# Altium PCB PCB.PcbDoc
Units mil, origin at the board's own origin, x right, y up, seen from the top; angles counter-clockwise.
Board outline 4265 x 3115 mil, 4 copper layers (Top Layer, Ground, Power, Bottom Layer), stack 61.811 mil thick; 45 components, 35 nets, 179 pads, 83 vias.
Unrouted connection lines stored in the file: 1.
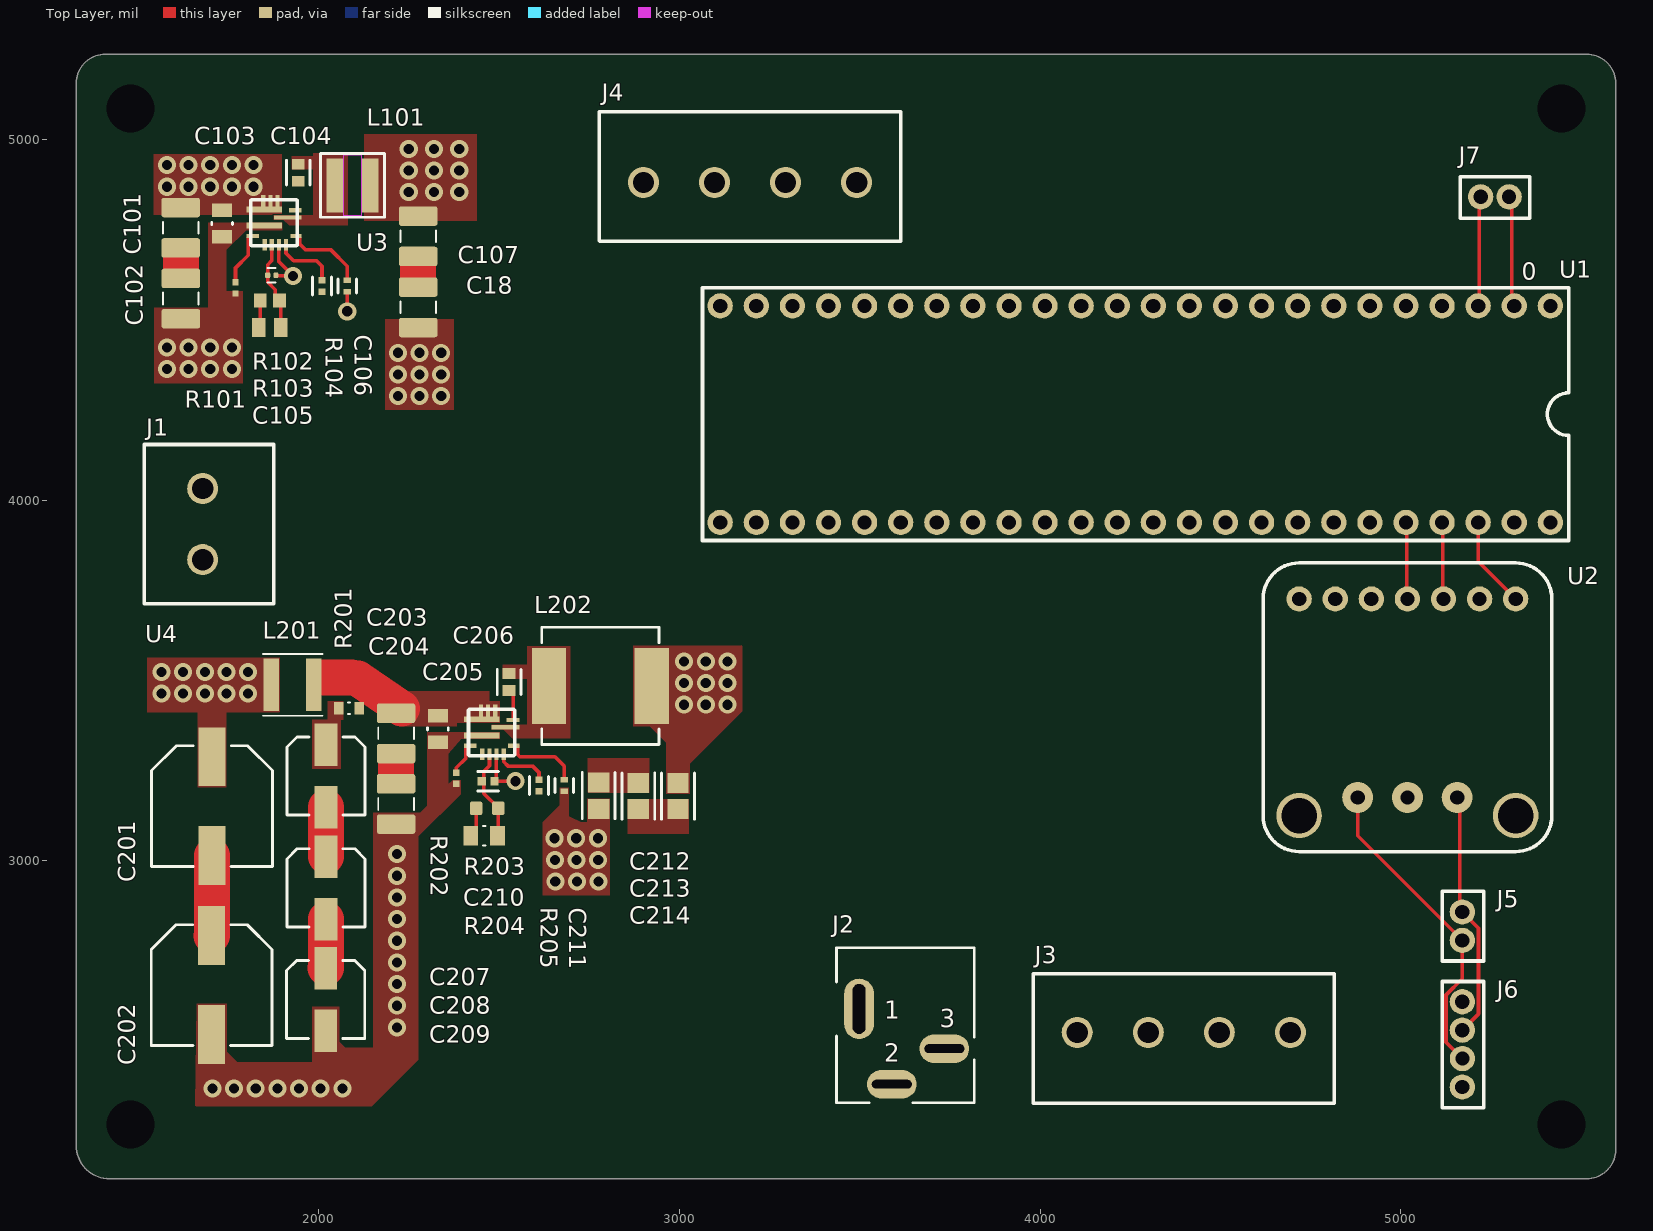
[diagram p0: Top Layer view]
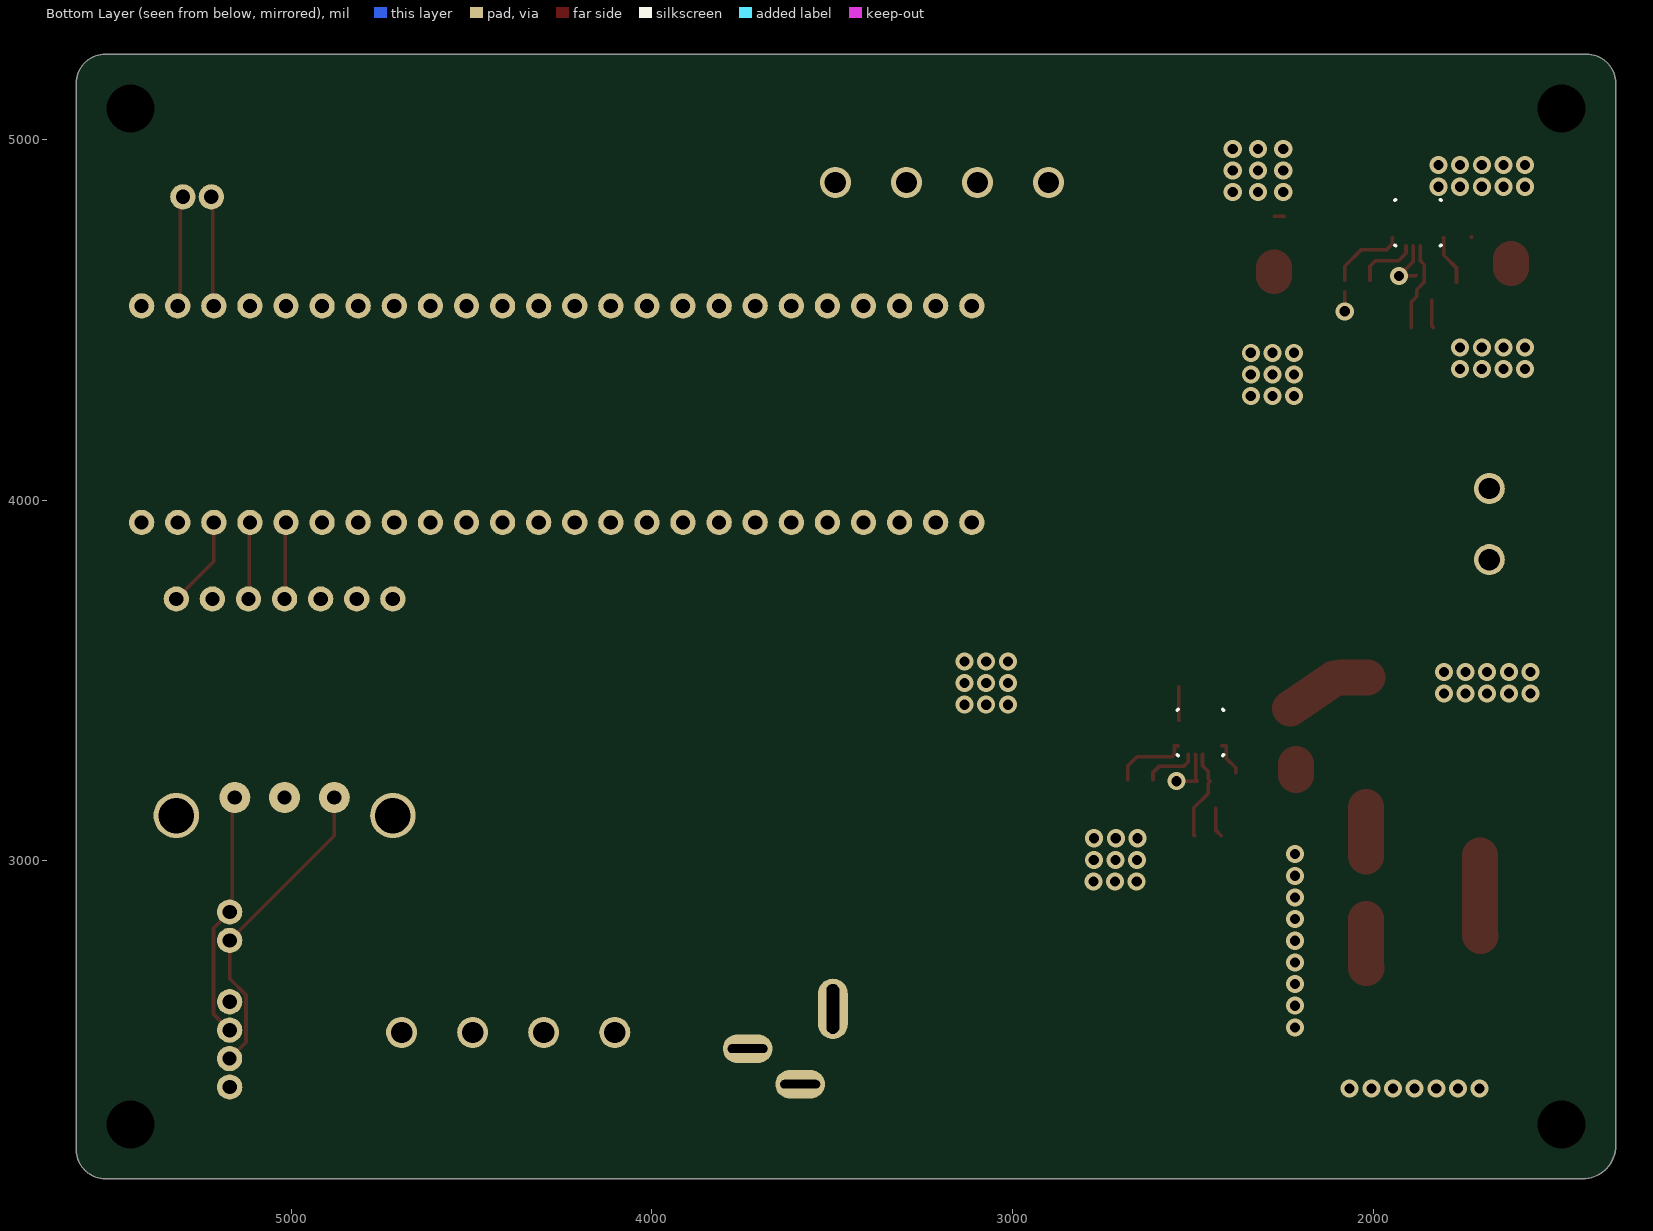
[diagram p1: Bottom Layer view, seen from below]
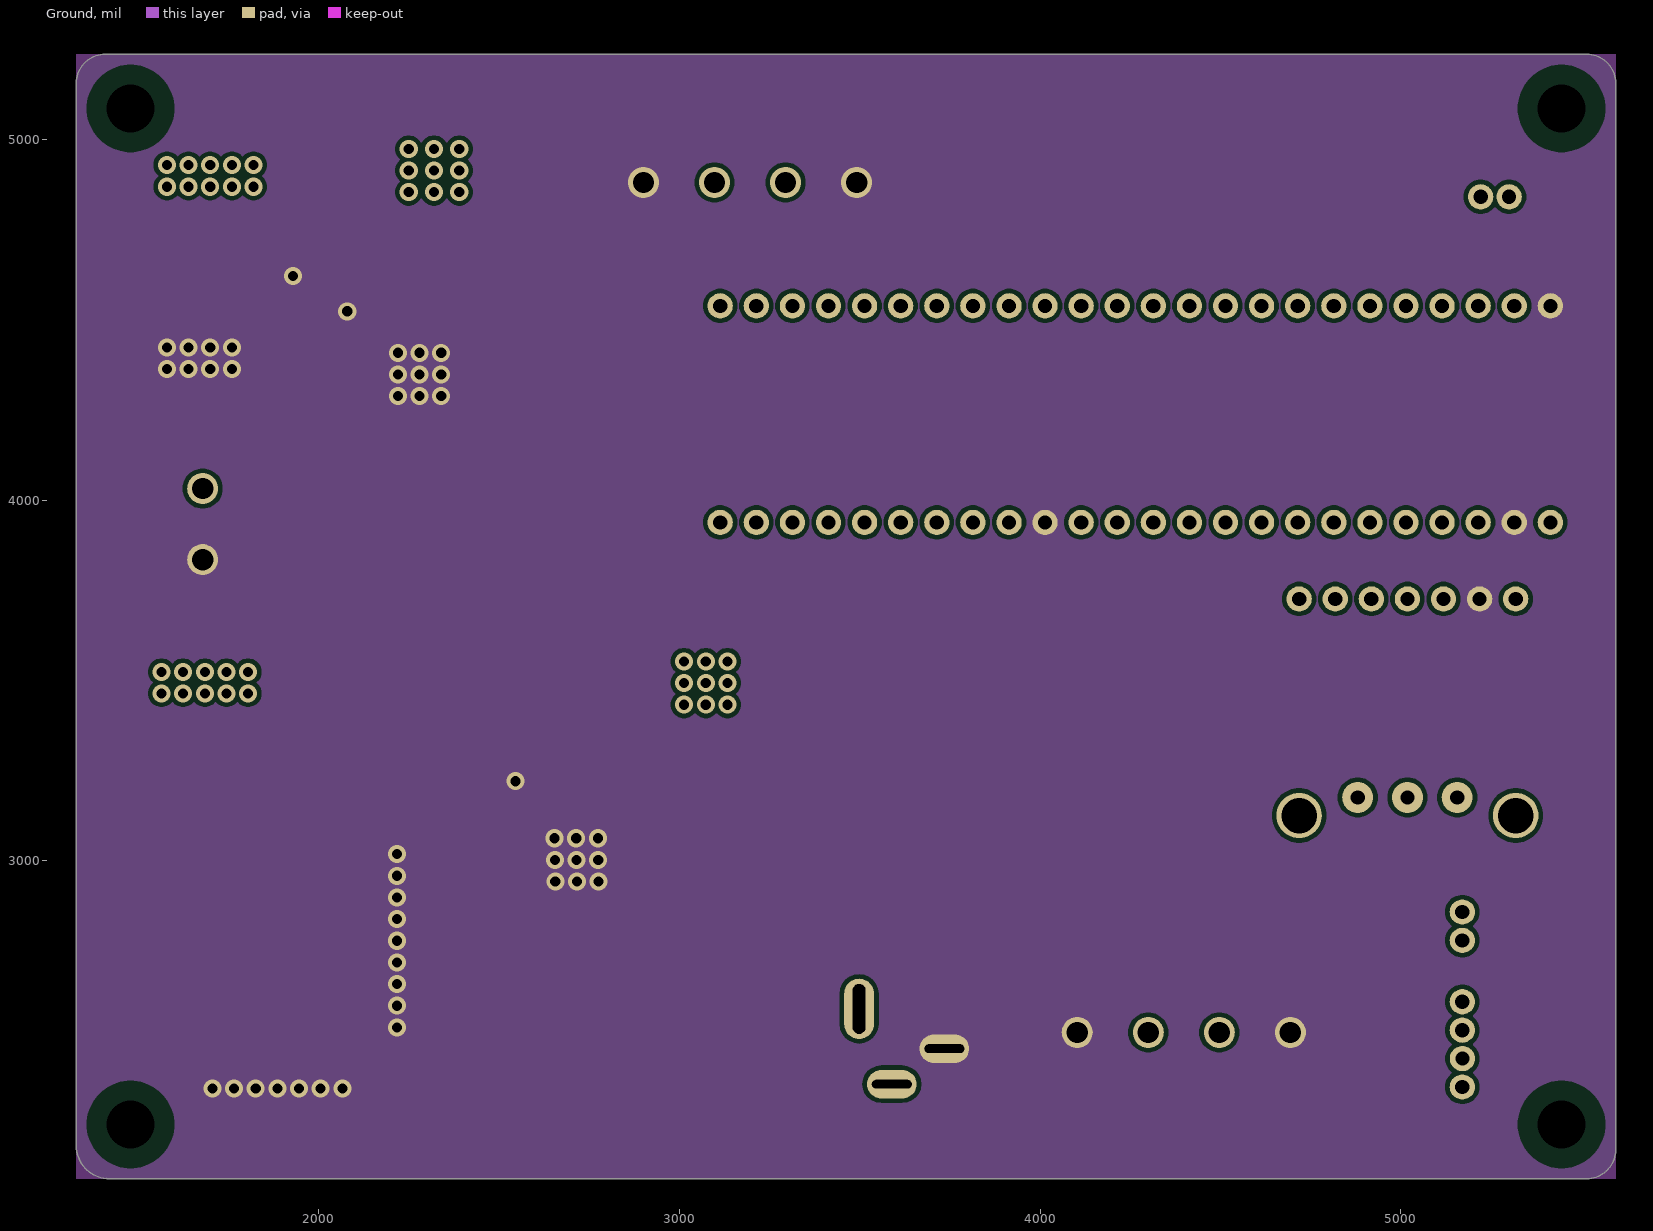
[diagram p2: Ground]
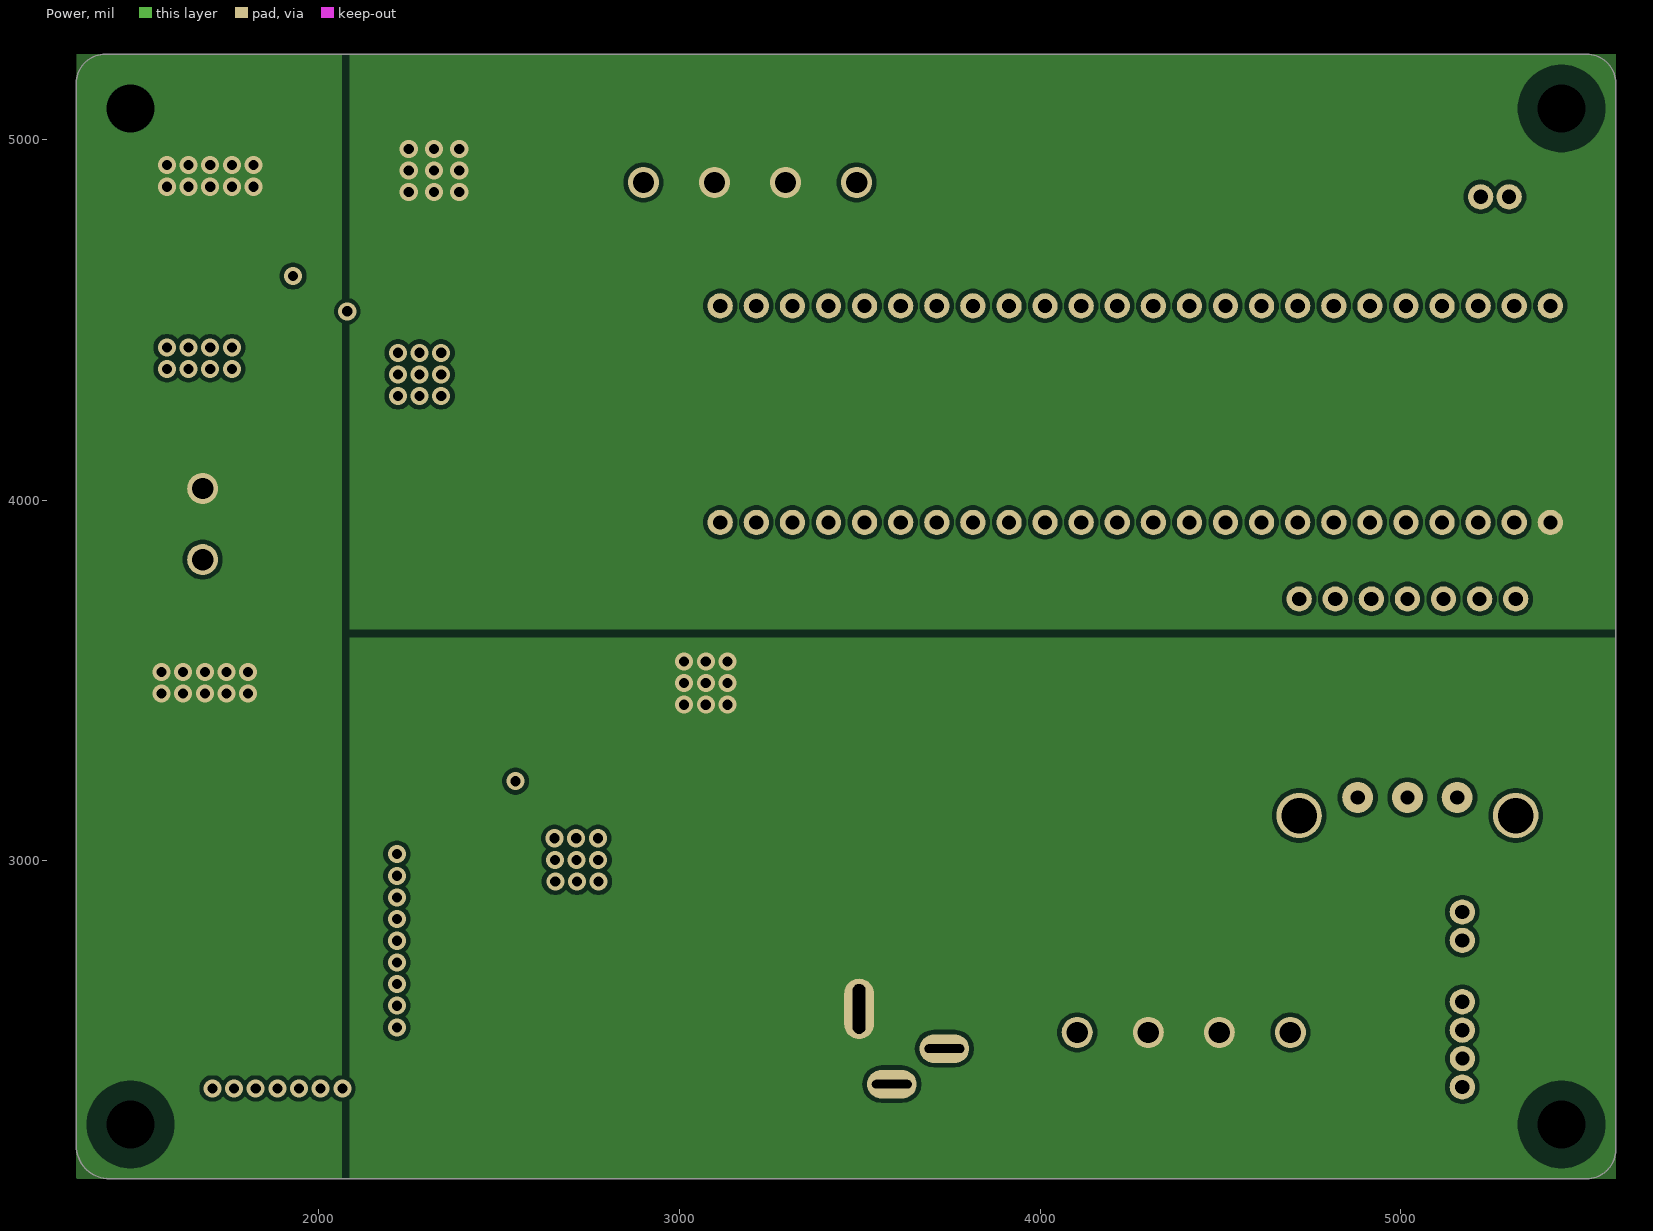
[diagram p3: Power]
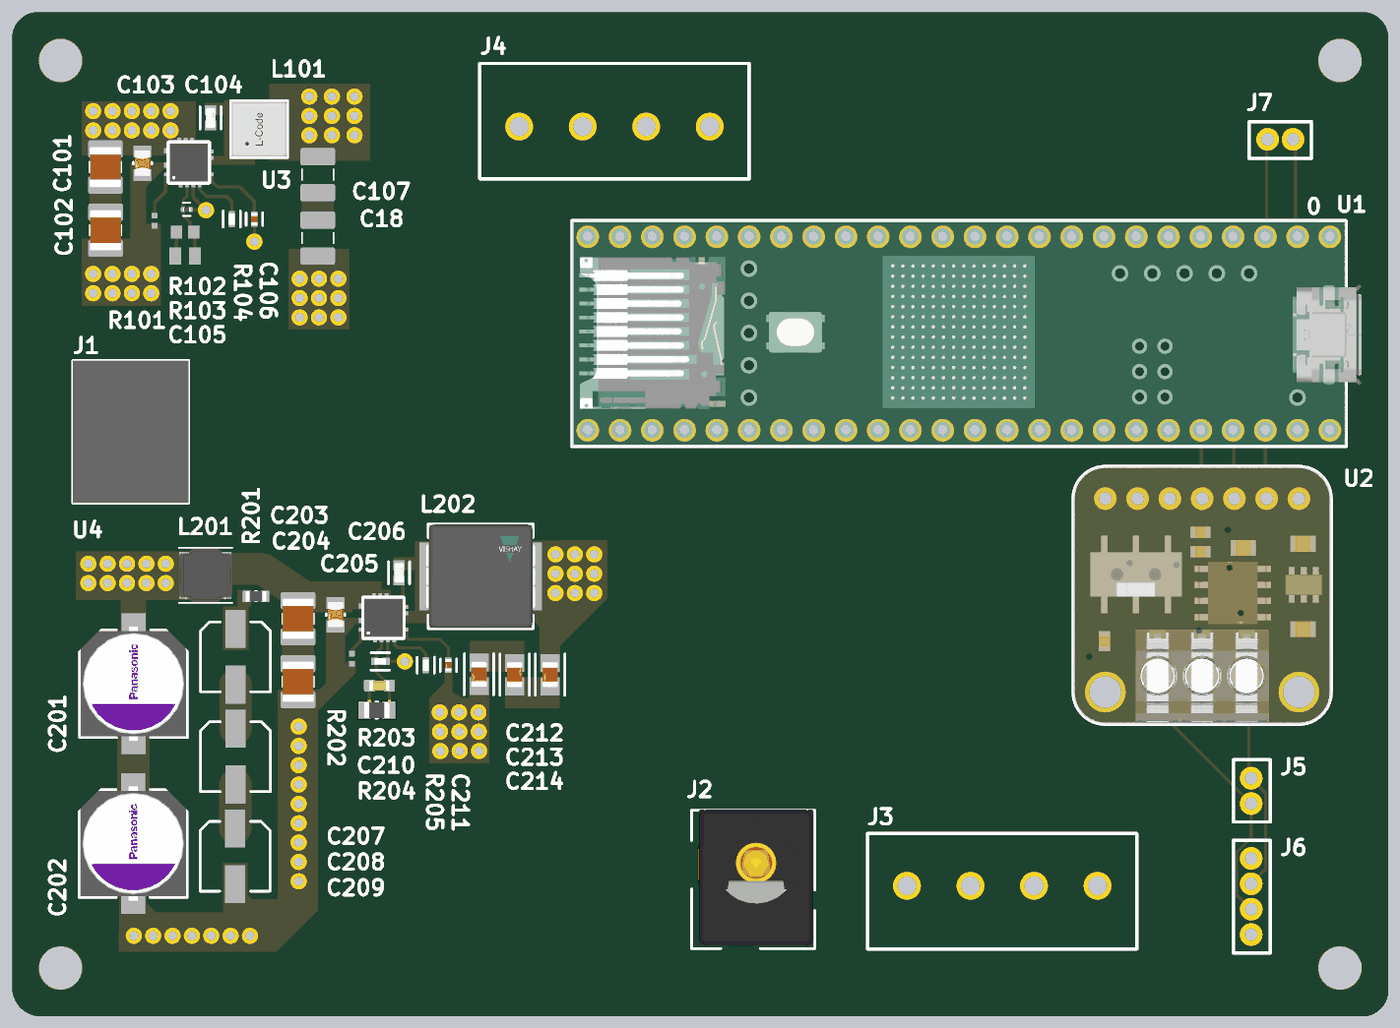
[diagram p4: 3D render of the assembled board from above, using the file's embedded part models]

## Layer stack, top to bottom
Top Solder: solder mask 0.4, Solder Resist, Dk 3.5
Top Layer: signal copper 1.378
Dielectric 2: prepreg 7.874, PP-006, Dk 4.7
Ground: signal copper 1.378
Dielectric 1: core 40.5512, Core-025, Dk 4.6
Power: signal copper 1.378
Dielectric 3: prepreg 7.874, PP-006, Dk 4.7
Bottom Layer: signal copper 1.378
Bottom Solder: solder mask 0.4, Solder Resist, Dk 3.5

## Board outline
1330,2210 1330,5155 cw(c1410,5155) 1410,5235 1405,5235 5515,5235 cw(c5515,5155) 5595,5155 5595,2200 cw(c5515,2200) 5515,2120 1415,2120 1420,2120 cw(c1420,2210)

## Design rules (kind name [scope] priority, off if disabled: settings)
Clearance "clearance poly to non vcc" [INPolygon vs ISThruPin OR IsVia] p1: gap=12 ignorepadtopadclearanceinfootprint=FALSE
Clearance "NET ini112v2" [InNet('NetC_IN1_12V_2') vs InNet('NetC_IN1_12V_2')] p2: gap=0 ignorepadtopadclearanceinfootprint=FALSE
Clearance [All] p3: gap=5 ignorepadtopadclearanceinfootprint=FALSE
PlaneClearance [InNet('NetC_IN1_12V_2')] p1: clearance=787.4
PlaneConnect "GND net" [InNet('GND')] p1: planeconnectstyle=Direct reliefexpansion=20 reliefentries=4 reliefconductorwidth=10 reliefairgap=10
PlaneConnect "12V net" [InNet('+12V')] p2: planeconnectstyle=Direct reliefexpansion=20 reliefentries=4 reliefconductorwidth=10 reliefairgap=10
PlaneConnect "5V net" [InNet('+5V')] p3: planeconnectstyle=Direct reliefexpansion=20 reliefentries=4 reliefconductorwidth=10 reliefairgap=10
PlaneConnect "VCC net" [InNet('VCC')] p4: planeconnectstyle=Direct reliefexpansion=20 reliefentries=4 reliefconductorwidth=10 reliefairgap=10
PlaneConnect [All] p5: planeconnectstyle=Relief reliefexpansion=20 reliefentries=4 reliefconductorwidth=10 reliefairgap=10
PolygonConnect "boot 12V2 poly" [InNet('NetC_BOOT_12V_2') vs InNet('NetC_BOOT_12V_2')] p1: connectstyle=Direct reliefconductorwidth=10 reliefentries=4 polygonreliefangle="90 Angle" airgapwidth=10
PolygonConnect "boot 5V2 poly" [InNet('NetC_BOOT_5V_2') vs InNet('NetC_BOOT_5V_2')] p2: connectstyle=Direct reliefconductorwidth=10 reliefentries=4 polygonreliefangle="90 Angle" airgapwidth=10
PolygonConnect "VCC poly" [InNet('VCC') vs InNet('VCC')] p3: connectstyle=Direct reliefconductorwidth=10 reliefentries=4 polygonreliefangle="90 Angle" airgapwidth=10
PolygonConnect "5V poly" [InNet('+5V') vs InNet('+5V')] p4: connectstyle=Direct reliefconductorwidth=10 reliefentries=4 polygonreliefangle="90 Angle" airgapwidth=10
PolygonConnect "12V poly" [InNet('+12V') vs InNet('+12V')] p5: connectstyle=Direct reliefconductorwidth=10 reliefentries=4 polygonreliefangle="90 Angle" airgapwidth=10
PolygonConnect "GND poly" [InNet('GND') vs InNet('GND')] p6: connectstyle=Direct reliefconductorwidth=10 reliefentries=4 polygonreliefangle="90 Angle" airgapwidth=10
PolygonConnect [All] p7: connectstyle=Direct reliefconductorwidth=10 reliefentries=4 polygonreliefangle="90 Angle" airgapwidth=10
RoutingVias [All] p1: holewidth=28 width=50 viastyle="Through Hole" minholewidth=28 minwidth=50 maxholewidth=28 maxwidth=50
SolderMaskExpansion [All] p1: expansion=0 istentingtop=FALSE
SupplyNets "Schematic Supply Nets_3" [InNet('+5V')] p1: voltage=0.000
SupplyNets "Schematic Supply Nets_2" [InNet('GND')] p2: voltage=0.000
SupplyNets "Schematic Supply Nets_1" [InNet('+12V')] p3: voltage=0.000
SupplyNets "Schematic Supply Nets" [InNet('VCC')] p4: voltage=0.000
Width [All] p1: maxlimit=100 minlimit=3 preferedwidth=10
28 further rules are at their usual default settings.

## Components (designator, comment, footprint, x,y, rotation, side; value= is the part's Value field where it differs from the comment)
C18 "MSAST32MSB7226KPNB25" CAPC3225X270N 2277.14,4533.94 r90 top
C101 "MSASU32MSB5106KPNA01" CAPC3225X270N 1619.1,4754.42 r90 top
C102 "MSASU32MSB5106KPNA01" CAPC3225X270N 1619.66,4558.35 r90 top
C103 "CC0805KRX7R9BB104" FP-CC0805-0_85-MFG 1733.83,4766.23 r270 top value="100 nF"
C104 "C0603C104Z4VACTU" FP-C0603C104Z4VACTU-MFG 1945,4907 r90 top
C105 "C0603C151K3GACTU" CAPC1608X87X35NL15T15 1866,4553 r180 top
C106 "GRM155R71C223KA01D" FP-GRM155-0_05-MFG 2080.73,4593 r270 top
C107 "MSAST32MSB7226KPNB25" CAPC3225X270N 2277.14,4730.8 r90 top
C201 "35SVPF39M" FP-OS-CON-SMT-E7-MFG 1706,3152 r90 top
C202 "35SVPF39M" FP-OS-CON-SMT-E7-MFG 1705,2656.19 r90 top
C203 "MSASU32MSB5106KPNA01" CAPC3225X270N 2216,3353.44 r90 top
C204 "MSASU32MSB5106KPNA01" CAPC3225X270N 2216,3158 r90 top
C205 "CC0805KRX7R9BB104" FP-CC0805-0_85-MFG 2332,3366 r270 top value="100 nF"
C206 "C0603C104Z4VACTU" FP-C0603C104Z4VACTU-MFG 2529,3496 r90 top
C207 "UUD1V100MCL1GS" NIC-CAPA2-5X5.8_V 2022,3235.39 r270 top
C208 "UUD1V100MCL1GS" NIC-CAPA2-5X5.8_V 2022,2925.61 r270 top
C209 "UUD1V100MCL1GS" NIC-CAPA2-5X5.8_V 2021,2616.39 r270 top
C210 "CL10C330JB8NNNC" CL10C330JB8NNNC 2533.29,3211 r180 top
C211 "GRM155R71C223KA01D" FP-GRM155-0_05-MFG 2682,3209.25 r270 top
C212 "GRM21BR61E106MA73L" FP-GRM21B-0_15-IPC_A 2997,3180 r270 top
C213 "GRM21BR61E106MA73L" FP-GRM21B-0_15-IPC_A 2887.24,3180 r90 top
C214 "GRM21BR61E106MA73L" FP-GRM21B-0_15-IPC_A 2777,3181 r270 top
J1 "TAH05-02-1-L-G" TAH05-02-1-L-G 1680,4031.85 r270 top
J2 "694108402002" 694108402002 3434.72,2331.06 r0 top
J3 "TAH05-04-1-L-G" TAH05-04-1-L-G 4815.75,2686.42 r180 top
J4 "TAH05-04-1-L-G" TAH05-04-1-L-G 2779.25,4718.58 r0 top
J5 "JST SM 2-PIN" "JST SM 2-PIN" 5114.88,2915.83 r270 top
J6 "JST XH 4-PIN" "JST XH 4-PIN" 5112.91,2668.07 r270 top
J7 "JST SM 2-PIN" "JST SM 2-PIN" 5356.84,4895.37 r180 top
L101 "74439324033" WE-XHMI_4030 2095,4872 r90 top
L201 "PA4332.222NLT" PA4332.222NLT 1834.06,3398 r0 top
L202 "IHLP3232DZER5R6M01" FP-IHLP-3232DZ-FP_2_413x5-MFG 2782,3485 r0 top
R101 "CRCW040252K3FKED" RESC1005X40X25LL05T05 1771,4588 r90 top
R102 "RC0201FR-0710KL" RESC0603X26N 1871,4623 r180 top
R103 "ERJ-6ENF7322V" RESC2013X70X40LL20T20 1866,4478 r180 top
R104 "CRCW0402100KFKED" FP-CRCW0402-e3-IPC_C 2010.68,4593 r270 top
R201 "ERJ-3RSFR10V" ERJ-3RSFR10V 2020.54,3363 r0 top
R202 "CRCW040252K3FKED" RESC1005X40X25LL05T05 2383,3229.25 r90 top
R203 "CRCW040220K0FKED" FP-CRCW0402-e3-IPC_B 2471,3221 r180 top
R204 "ERJ-6ENF3833V" RESC2012X70N 2459.99,3070 r180 top
R205 "CRCW0402100KFKED" FP-CRCW0402-e3-IPC_C 2611.95,3209.25 r270 top
U1 "teensy 4.1" "Teensy 4.1" 3064.79,4588 r270 top
U2 "Adafruit CAN PAL" "ADAFRUIT CAN PAL" 5418,3826 r180 top
U3 "Comment" TPS56A37RPAR 1814.62,4832.41 r270 top
U4 "TPS56A37RPAR" TPS56A37RPAR 2417.57,3420.05 r270 top

## Footprints (in the part's own frame and the unit in brackets; to place one, negate y for a bottom-side part, rotate by r counter-clockwise, add the part's x,y. Pads: shape width x height; smd on the part's side, far side on the other; paste and mask are expansions set on the pad)
694108402002 [mm]
  oval 2.1x4.25 hole 0.9 slot 3.5 at 90 deg mask+0.102: 1(1.627,6.583)
  oval 3.5x2 hole 0.6 slot 2.8 at 0 deg mask+0.102: 2(3.927,1.283) 3(7.627,3.783)
  silkscreen extent 0.03,-0.02 9.73,10.88, body extent 0.6,0.23 9.6,10.92, height 14
"ADAFRUIT CAN PAL" [mil]
  round 86 hole 39.37: 1(262.2,650) 2(400,650) 3(537.8,650)
  round 70 hole 39.37: 4(100,100) 5(200,100) 6(300,100) 7(400,100) 8(500,100) 9(600,100) 10(700,100)
  round 125.98 hole 98.43: P1(100,700) P2(700,700)
  silkscreen extent 0,0 800,800, body extent 0,0 800,800, height 396
CAPC1608X87X35NL15T15 [mm] "Chip Capacitor, 2-Leads, Body 1.60x0.80mm, IPC Medium Density"
  rect 0.9x1 smd: 1(-0.675,0) 2(0.675,0)
  body extent -0.87,-0.48 0.87,0.47, height 0.87
CAPC3225X270N [mm]
  rrect25% 1.37x2.72 smd: 1(-1.42,0) 2(1.42,0)
  silkscreen extent -0.42,-1.25 0.42,1.25
CL10C330JB8NNNC [mm]
  rrect25% 0.87x0.93 smd: 1(0.871,1.651) 2(2.431,1.651)
  body extent 0.85,1.25 2.45,2.05, height 0.9
ERJ-3RSFR10V [mm]
  rect 0.65x0.9 smd: 1(0.926,1.524) 2(2.376,1.524)
  silkscreen extent 1.57,1.12 1.73,1.92, body extent 0.85,1.12 2.45,1.92, height 0.45
FP-C0603C104Z4VACTU-MFG [mm]
  rect 0.75x0.9 smd paste+0 mask+0: 1(-0.6,0) 2(0.6,0)
  silkscreen extent -0.87,-0.83 0.87,0.83, body extent -1.2,-0.6 1.2,0.6, height 0.25
FP-CC0805-0_85-MFG [mm]
  rect 0.95x1.4 smd paste+0 mask+0: 1(-0.925,0) 2(0.925,0)
  silkscreen extent -0.08,-0.72 0.08,0.72, body extent -1.6,-1.05 1.6,1.05, height 0.25
FP-CRCW0402-e3-IPC_B [mil]
  rect 22.37x22.54 smd paste+0 mask+0: 1(-17.8,0) 2(17.8,0)
  silkscreen extent -29,-27 29,27, body extent -35,-17 35,17, height 10
FP-CRCW0402-e3-IPC_C [mil]
  rect 18.43x18.6 smd paste+0 mask+0: 1(-15.83,0) 2(15.83,0)
  silkscreen extent -25,-27 25,27, body extent -29,-15 29,15, height 10
FP-GRM21B-0_15-IPC_A [mil]
  rect 55.34x59.38 smd paste+0 mask+0: 1(-36.47,0) 2(36.47,0)
  silkscreen extent -64,-45 64,45, body extent -84,-49 84,49, height 10
FP-GRM155-0_05-MFG [mm]
  rect 0.4x0.5 smd paste+0 mask+0: 1(-0.4,0) 2(0.4,0)
  silkscreen extent -0.5,-0.65 0.5,0.65, body extent -0.7,-0.38 0.7,0.38, height 0.25
FP-IHLP-3232DZ-FP_2_413x5-MFG [mil]
  rect 95x210 smd paste+0 mask+0: 1(-142.5,0) 2(142.5,0)
  silkscreen extent -163,-163 163,163, body extent -194,-166 194,166, height 10
FP-OS-CON-SMT-E7-MFG [mm]
  rect 4.15x1.9 smd paste+0 mask+0: 1(-3.475,0) 2(3.475,0)
  silkscreen extent -4.25,-4.25 4.25,4.25, body extent -5.8,-4.5 5.8,4.5, height 0.25
"JST SM 2-PIN" [mm]
  round 1.778 hole 1: 1(1.45,1.4) 2(3.45,1.4)
  silkscreen extent 0,0 4.9,2.9
"JST XH 4-PIN" [mm]
  round 1.778 hole 1: 1(1.475,1.45) 2(3.475,1.45) 3(5.475,1.457) 4(7.475,1.45)
  silkscreen extent 0.05,0.05 8.93,2.95
NIC-CAPA2-5X5.8_V [mm] "Aluminum Electrolytic Capacitor, Diameter 5mm, Height 6.1mm, Pitch 4.4mm"
  rect 3x1.6 smd: 1(-2.2,0) 2(2.2,0)
  silkscreen extent -2.75,-2.75 2.75,2.75, body extent -2.5,-2.48 2.49,2.5, height 6.1
PA4332.222NLT [mm]
  rect 1.1x3.7 smd: 1(0.913,2.286) 2(3.913,2.286)
  silkscreen extent 0.31,0.12 4.51,4.46, body extent 0.31,0.19 4.51,4.39, height 2
RESC0603X26N [mm]
  rrect50% 0.33x0.4 smd: 1(-0.305,0)
  rrect50% 0.38x0.4 smd: 2(0.28,0)
  silkscreen extent -0.3,-0.52 0.3,0.52, body extent -0.3,-0.15 0.3,0.15, height 0.26
RESC1005X40X25LL05T05 [mm] "Chip Resistor, 2-Leads, Body 1.00x0.50mm, IPC High Density"
  rect 0.45x0.45 smd: 1(-0.4,0) 2(0.4,0)
  body extent -0.53,-0.27 0.53,0.28, height 0.4
RESC2012X70N [mm]
  rect 1.04x1.38 smd paste+0 mask+0.102: 1(-0.94,0) 2(0.94,0)
  silkscreen extent -0.1,-0.68 0.1,0.68, body extent -1,-0.63 1,0.63, height 0.6
RESC2013X70X40LL20T20 [mm] "Chip Resistor, 2-Leads, Body 2.00x1.25mm, IPC High Density"
  rect 0.95x1.35 smd: 1(-0.775,0) 2(0.775,0)
  body extent -1.1,-0.72 1.1,0.72, height 0.7
TAH05-02-1-L-G [mil]
  round 86 hole 59.06: 1(0,0) 2(196.85,0)
  silkscreen extent -122,-161 319,197, body extent -122,-161 319,197, height 516
TAH05-04-1-L-G [mm]
  round 2.184 hole 1.5: 1(3.1,4.1) 2(8.1,4.1) 3(13.1,4.1) 4(18.1,4.1)
  silkscreen extent 0,-0.02 21.2,9.07
"Teensy 4.1" [mil]
  round 70 hole 39.37: 0(50,2249.21) 1(50,2149.21) 2(50,2049.21) 3(50,1949.21) 3V1(650,2149.21) 3V2(50,949.21) 4(50,1849.21) 5(50,1749.21) 5V(650,2349.21) 6(50,1649.21) 7(50,1549.21) 8(50,1449.21) 9(50,1349.21) 10(50,1249.21) 11(50,1149.21) 12(50,1049.21) 13(650,1049.21) 14(650,1149.21) 15(650,1249.21) 16(650,1349.21) 17(650,1449.21) 18(650,1549.21) 19(650,1649.21) 20(650,1749.21) 21(650,1849.21) 22(650,1949.21) 23(650,2049.21) 24(50,849.61) 25(50,749.21) 26(50,649.21) 27(50,549.21) 28(50,449.21) 29(50,349.21) 30(50,249.21) 31(50,149.21) 32(50,49.21) 33(650,49.21) 34(650,149.21) 35(650,249.21) 36(650,349.21) 37(650,449.21) 38(650,549.21) 39(650,649.21) 40(650,749.21) 41(650,849.61) G1(50,2349.21) G2(650,2249.21) G3(650,949.21)
  silkscreen extent 0,0 700,2400, body extent -2,-1 698,2448, height 148
TPS56A37RPAR [mm]
  rect 0.8x0.3 smd: 1(3.165,0.95) 2(3.165,1.45) 3(3.165,1.95) 4(3.165,2.45)
  rect 0.3x0.8 smd: 5(2.555,3.15)
  rect 0.3x1.95 smd: 6(1.255,2.575)
  rect 0.3x0.9 smd: 7(0.755,3.1) 10(2.555,0.1)
  rect 0.815x0.3 smd: 8(0.08,1.85) 8(0.08,1.35) 8(0.08,0.85)
  rect 0.41x2.5 smd: 8(0.69,0.9) 9(1.83,0.9)
  silkscreen extent 0,-0.03 3.25,3.23, body extent 0.13,0.1 3.13,3.1, height 1
WE-XHMI_4030 [mm] "SMD Power Inductor, body 4.30 x 4.30 mm"
  rect 3.8x1.2 smd: 1(0,1.225) 2(0,-1.225)
  Top Layer keep-out region: -2.15,0.625 2.15,0.625 2.15,-0.625 -2.15,-0.625
  silkscreen extent -2.25,-2.25 2.25,2.25, body extent -2.15,-2.15 2.15,2.15, height 3.01

## Part data
C18 C107: Package=None, Availability=Unavailable, MF="{'manufacturer': u'Taiyo Yuden'}", MP=MSAST32MSB7226KPNB25, Price=None
C101 C102 C203 C204: "10uF 50V 10% Multilayer Ceramic Capacitor X5R 1210 (3225 Metric)", Package="3225-2 TAIYO", Check_prices=https://www.snapeda.com/parts/MSASU32MSB5106KPNA01/Taiyo+Yuden/view-part/?ref=eda, MF="Taiyo Yuden", MP=MSASU32MSB5106KPNA01, SnapEDA_Link=https://www.snapeda.com/parts/MSASU32MSB5106KPNA01/Taiyo+Yuden/view-part/?ref=snap
C103 C205: library part CMP-2100-03606-3, "CAP CER 0.1UF 50V X7R 0805", Capacitance="100 nF", Manufacturer=Yageo, Package=CC0805-0.85, Temperature="-30°C to +85°C", Temperature Characteristic=X7R, Temperature Range High=+85°C, Temperature Range Low=-30°C, Tolerance=0.1, Voltage Rating="50 V", Automotive=No, Category=Cap, ComponentLink2Description=Datasheet, ComponentLink2URL=http://www.yageo.com/documents/recent/UPY-GPHC_Y5V_6.3V-to-50V_8.pdf, Device Class L1="Passive Components", Device Class L2=Capacitors, Device Class L3="Ceramic Capacitors", Digikey Description="CAP CER 0.1UF 50V X7R 0805", Footprint Url=http://www.yageo.com/exep/pages/download/literatures/UPY-C_GEN_24.pdf, Height=0.95mm, Ipc Land Pattern Name=CAPC200125X85, Lead Free=Yes, Manufacturer Part Number=CC0805KRX7R9BB104, Material=Ceramic, Mouser Description="Multilayer Ceramic Capacitors MLCC - SMD/SMT 100nF 50V X7R 10%", Octopart=https://octopart.com/cc0805krx7r9bb104-yageo-192993, RoHS=TRUE
C104 C206: library part CMP-2006-03071-2, "CAP CER 0.1UF 16V Y5V 0603", Capacitance=100nF, Case Code (Imperial)=0603, Case Code (Metric)=1608, Dielectric=Y5V, Dielectric Material=Ceramic, Max Operating Temperature=85°C, Min Operating Temperature=-30°C, Package Quantity=4000, Tolerance=80%, Voltage Rating=16V, Case/Package=0603, Construction=Flat, Depth=0.8mm, Height=0.8mm, Lead Free="Lead Free", Lead Pitch=0.7mm, Length=1.6mm, Mount="Surface Mount", Number of Pins=2, Packaging="Tape and Reel", Radiation Hardening=No, REACH SVHC="No SVHC", RoHS Compliant=Yes, Series=C, Termination=SMD/SMT, Thickness=0.034inch, Voltage Rating (DC)=16V, Width=0.031inch
C105: library part CMP-2006-03084-1, Manufacturer=Kemet, Part Number=C0603C151K3GACTU
C106 C211: library part CMP-1034-01948-3, "Chip Multilayer Ceramic Capacitors for General Purpose, 0402, 22000pF, X7R, 15%, 10%, 16V", Capacitance=22nF, Case Code (Imperial)=0402, Case Code (Metric)=1005, Dielectric=X7R, Max Operating Temperature=125°C, Min Operating Temperature=-55°C, Package Quantity=10000, Tolerance=10%, Voltage=16V, Case/Package=0402, Depth=0.5mm, Height=0.5mm, Lead Free="Lead Free", Length=1mm, Material=Ceramic, Mount="Surface Mount", Number of Pins=2, Packaging="Tape and Reel", Radiation Hardening=No, REACH SVHC="No SVHC", Termination=SMD/SMT, Thickness=0.022inch, Voltage Rating=16V, Voltage Rating (DC)=16V, Weight=2.3E-05oz, Width=0.02inch
C201 C202: library part CMP-05428-001379-1, "Conductive Polymer Aluminum Solid Capacitors (OS-CON) 39uF ±20% 35V RADIAL SMT 8x6.9mm", Capacitance=39uF, Case/Package=Radial, ESR (Equivalent Series Resistance)=30mR, Leakage Current=273uA, Max Operating Temperature=105°C, Min Operating Temperature=-55°C, Package Quantity=1000, Ripple Current=2.8A, Tolerance=20%, Voltage=35V, Diameter=8mm, Dissipation Factor=12%, Height=6.9mm, Height - Seated (Max)=0.276inch, Lead Free="Lead Free", Length=6.9mm, Life (Hours)=5000Hour, Mount="Surface Mount", Number of Pins=7, Packaging="Tape and Reel", Polarity=Polar, REACH SVHC="No SVHC", Ripple Current (AC)=2.8A, RoHS Compliant=Yes, Series="OS-CON™, SVPF", Termination=SMD/SMT, Voltage Rating=35V, Voltage Rating (DC)=35V
C207 C208 C209: library part CMP-0687-00026-1, "Aluminum Electrolytic Capacitor, UD Series, Low Impedance, 10 uF, 35 V, + / - 20%, -55 to 105 degC, Chip Type, 5 x 5.8 mm D x L, Pb-Free, Reel", Manufacturer=Nichicon, Rated Capacitance="10 uF", Rated Ripple Current (at 100kHz)="150 mA", Rated Voltage="35 V", Tolerance Rated Capacitance="-20 to 20%", ComponentLink1Description="Manufacturer URL", ComponentLink1URL=http://www.nichicon.co.jp/, ComponentLink2Description=Datasheet, ComponentLink2URL=http://products.nichicon.co.jp/en/pdf/XJA043/e-ud.pdf, ComponentLink3Description="Package Specification", ComponentLink3URL=http://products.nichicon.co.jp/en/pdf/XJA043/e-ud.pdf, DatasheetVersion=08/2012, Diameter="5 mm", Endurance Time="2000 h", Impedance="0.76 Ohm", Length="5.8 mm", Mounting Technology="Surface Mount", PackageDescription="2-Pin Surface Mount Device, Diameter 5 mm, Height 5.8 mm, Pitch 4.4 mm", PackageReference=CAPAE-D5H5.8, Packing="Dia382mm Reel", PartNumber=UUD1V100MCL1GS, RoHS=TRUE
C212 C213 C214: library part CMP-06035-013048-1, "Chip Multilayer Ceramic Capacitors for General Purpose, 0805, 10uF, X5R, 15%, 20%, 25V", Capacitance=10uF, Case Code (Imperial)=0805, Case Code (Metric)=2012, Dielectric=X5R, Max Operating Temperature=85°C, Min Operating Temperature=-55°C, Package Quantity=3000, Resistor Type=Ceramic, Tolerance=20%, Voltage Rating=25V, Case/Package=0805, Depth=1.25mm, Height=1.25mm, Lead Free="Lead Free", Length=2mm, Mount="Surface Mount", Packaging="Tape and Reel", REACH SVHC="No SVHC", Termination=SMD/SMT, Thickness=0.055inch, Voltage Rating (DC)=25V, Weight=0.000335oz, Width=0.049inch
L101: library part CMP-03913-148605656-1, "Power Inductor, 3.3UH, Shielded, 7.1A Rohs Compliant: Yes"
L202: library part CMP-02424-000336-1, "Commercial Inductors, High Saturation Series 5.6uH 6.8A 35.5mΩ 20%", Case/Package=3232, Current Rating=6.8A, DC Resistance (DCR)=35.5mR, Inductance=5.6uH, Inductance Tolerance=20%, Max DC Current=16.7A, Max Operating Temperature=125°C, Min Operating Temperature=-55°C, Package Quantity=500, Self Resonant Frequency=18MHz, Test Frequency=100kHz, Depth=8.94mm, Height=4mm, Height - Seated (Max)=0.157inch, Lead Free="Lead Free", Length=0.34inch, Military Standard=Not, Mount="Surface Mount", Packaging="Tape and Reel", Radiation Hardening=No, RMS Current (Irms)=6.8A, Saturation Current=16.7A, Shielding=Shielded, Termination=SMD/SMT, Tolerance=20%, Width=8.18mm
R101 R202: library part CMP-2002-00086-1, Manufacturer="Vishay Dale", Part Number=CRCW040252K3FKED
R102: "10 kOhms Â±1% 0.05W, 1/20W Chip Resistor 0201 (0603 Metric) Moisture Resistant Thick Film", Package="0201 Yageo", Check_prices=https://www.snapeda.com/parts/RC0201FR-0710KL/Yageo/view-part/?ref=eda, MF=Yageo, MP=RC0201FR-0710KL, SnapEDA_Link=https://www.snapeda.com/parts/RC0201FR-0710KL/Yageo/view-part/?ref=snap
R103: library part CMP-2001-00287-1, Manufacturer=Panasonic, Part Number=ERJ-6ENF7322V
R104 R205: library part CMP-2002-08123-3, "RES Thick Film, 100kΩ, 1%, 0.063W, 100ppm/°C, 0402", Case Code (Imperial)=0402, Case Code (Metric)=1005, Max Operating Temperature=155°C, Max Power Dissipation=63mW, Min Operating Temperature=-55°C, Package Quantity=10000, Resistance=100kR, Temperature Coefficient=100ppm/°C, Tolerance=1%, Voltage Rating=50V, Case/Package=0402, Composition="Thick Film", Contact Plating=Tin, Depth=0.5mm, Features="Automotive AEC-Q200", Height=0.35mm, Lead Free="Lead Free", Length=1mm, Military Standard=Not, Mount="Surface Mount", Number of Pins=2, Number of Terminations=2, Packaging="Tape and Reel", Power Rating=63mW, Radiation Hardening=No, Termination=SMD/SMT, Voltage Rating (DC)=50V, Weight=2.3E-05oz, Width=0.02inch
R203: library part CMP-2002-08356-2, "RES Thick Film, 20kΩ, 1%, 0.063W, 100ppm/°C, 0402", Case Code (Imperial)=0402, Case Code (Metric)=1005, Max Operating Temperature=155°C, Max Power Dissipation=63mW, Min Operating Temperature=-55°C, Package Quantity=10, Resistance=20kR, Temperature Coefficient=100ppm/°C, Tolerance=1%, Voltage Rating=50V, Case/Package=0402, Composition="Thick Film", Contact Plating=Tin, Depth=0.5mm, Features="Automotive AEC-Q200", Height=0.35mm, Lead Free="Lead Free", Length=1mm, Military Standard=Not, Mount="Surface Mount", Number of Pins=2, Number of Terminations=2, Packaging="Tape and Reel", Power Rating=63mW, Radiation Hardening=No, Termination=SMD/SMT, Voltage Rating (DC)=50V, Weight=2.3E-05oz, Width=0.5mm, Working Voltage=50V
R204: "Res Thick Film 0805 383K Ohm 1% 1/8W 100ppm/C Molded SMD SMD Punched Carrier T/R", Package="2012-2 Panasonic", Check_prices=https://www.snapeda.com/parts/ERJ-6ENF3833V/Panasonic/view-part/?ref=eda, MF=Panasonic, MP=ERJ-6ENF3833V, SnapEDA_Link=https://www.snapeda.com/parts/ERJ-6ENF3833V/Panasonic/view-part/?ref=snap
U1: library part "Teensy 4.1", "Microcontroller"
U3: library part TPS56A37RPAR

## Free pads (board coordinates)
  round 0 hole 133.86: 2(1480,2270) 2(1480,5085) 2(5445,2270) 2(5445,5085)

## Via types
v1: diameter 50, hole 28, Top Layer to Bottom Layer, 83 vias

## Nets (pads, with @x,y where several pads share a name; then routed paths per layer and width w, separated by ;. In a path a pad name is that pad's centre, name@x,y a point inside that pad or via, vN(x,y) a via of type N, cw(c..) or ccw(c..) an arc to the next point about the centre after c; other vN are vias at no path point)
+5V: C107.2 J4.2 J4.3 L101.2 U1.5V | length 26.6
  Top Layer w10: C107.2@2249.02,4786.7 C107.2@2275.6,4786.7
  other v1: 2251,4853 2321,4853 2391,4853 2251,4913 2321,4913 2391,4913 2251,4973 2321,4973 2391,4973
+12V: C212.1 J2.1 J3.2 J3.3 L202.2
  other v1: 3014,3433 3074,3433 3134,3433 3014,3493 3074,3493 3134,3493 3014,3553 3074,3553 3134,3553
GND: C18.1 C102.1 C103.2 C106.2 C202.1 C204.1 C205.2 C209.2 C211.2 C214.2 J1.2 J2.3 J3.1 J3.4 J4.1 J4.4 R101.1 R102.1 R202.1 R203.1 U1.G1 U1.G2 U1.G3 U2.5 U3.3 U3.9 U4.3 U4.9 | length 339.5
  Top Layer w10: C103.2@1729.34,4728.71 C103.2@1730.44,4729.81 ; R102.1 1884.23,4621.78 1929.46,4621.78 v1(1930.68,4620.56) 1891.39,4659.85 U3.3@1891.39,4704.38 ; v1(2080.68,4523) C106.2@2080.71,4577.23 ; U4.3 2493.43,3294.54 2493.43,3225.63 R203.1 v1(2547,3221)
  other v1: 1707,2370 1767,2370 1827,2370 1887,2370 1947,2370 2007,2370 2067,2370 2218,2539 2218,2599 2218,2659 2218,2719 2218,2779 2218,2839 2218,2899 2657,2943 2717,2943 2777,2943 2218,2959 2656,3003 2716,3003 2776,3003 2218,3019 2655,3063 2715,3063 2775,3063 2221,4288 2281,4288 2341,4288 2221,4348 2281,4348 2341,4348 1581,4363 1641,4363 1701,4363 1761,4363 2221,4408 2281,4408 2341,4408 1581,4423 1641,4423 1701,4423 1761,4423
NetC18_2: C18.2 C107.1 | length 23.8
  Top Layer w100: 2277.14,4620.56 2277.14,4644.38
NetC101_1: C101.1 C102.2 | length 25
  Top Layer w100: 1619.66,4643 1619.66,4668
NetC104_1: C104.1 U3.7
NetC104_2: C104.2 L101.1 U3.6
NetC105_1: C105.1 R102.2 R103.1 U3.2 | length 246.4
  Top Layer w10: U3.2@1871.71,4704.38 1871.71,4663.87 1859.98,4652.13 R102.2 1859.98,4604.02 1881,4583 1881,4564.57 C105.1 1896.51,4549.06 R103.1
NetC105_2: C105.2 R103.2 | length 76.6
  Top Layer w10: R103.2 1839.43,4481.94 C105.2
NetC106_1: C106.1 U3.5 | length 213.7
  Top Layer w10: U3.5@1948.48,4726.82 1949.39,4725.91 1949.39,4709.61 1966,4693 2035.68,4693 2080.68,4648 2080.68,4608.8 C106.1
NetC201_1: C201.1 C202.2 | length 222.6
  Top Layer w100: C202.2 1705.5,2793.5 1705.5,3014.69 C201.1
NetC203_1: C203.1 C204.2 | length 30
  Top Layer w100: C204.2@2216,3238 2216,3268
NetC203_2: C203.2 C205.1 L201.2 R201.2 U4.8 | length 258.6
  Top Layer w10: L201.2 1988.11,3501.35 L201.2@2004.76,3518
  Top Layer w100: 2018,3508 2093,3508 ; 2110,3505 C203.2@2231.63,3423
NetC206_1: C206.1 U4.7 | length 92.5
  Top Layer w10: U4.7 2540.09,3390.32 2541,3391.23 C206.1@2541,3482
NetC206_2: C206.2 L202.1 U4.6
NetC207_1: C207.1 R201.1
NetC207_2: C207.2 C208.1 | length 136.5
  Top Layer w100: C208.1 C207.2
NetC208_2: C208.2 C209.1 | length 136.4
  Top Layer w100: C209.1 2021.5,2703.5 2021.5,2838.49 C208.2
NetC210_1: C210.1 R203.2 R204.1 U4.2 | length 254.1
  Top Layer w10: U4.2 2474.65,3263.62 2458.31,3247.27 2458.31,3226.11 R203.2 2459,3215.2 2459,3187.18 2499,3147.18 C210.1 2499,3072 R204.1
NetC210_2: C210.2 R204.2 | length 82
  Top Layer w10: R204.2 2437.58,3084.6 C210.2
NetC211_1: C211.1 U4.5 | length 215.3
  Top Layer w10: U4.5 2551.43,3319.46 2552.33,3318.55 2552.33,3308.71 2553,3308.04 2553,3294.86 2558.86,3289 2656,3289 2682,3263 C211.1
NetC212_2: C212.2 C213.1
NetC213_2: C213.2 C214.1
NetJ5_1: J5.1 J6.2 U2.1 | length 687.9
  Top Layer w10: U2.1 5162.9,3168.9 5162.9,2865.84 J5.1 5215,2813.74 5215,2576.26 J6.2
NetJ5_2: J5.2 J6.3 U2.3 | length 880.9
  Top Layer w10: U2.3 4880.2,3069.8 J5.2 5170,2673.64 5125,2628.64 5125,2497.81 J6.3
NetJ7_1: J7.1 U1.0 | length 308.2
  Top Layer w10: J7.1 5306.88,4833.12 5306.88,4545.12 U1.0
NetJ7_2: J7.2 U1.1 | length 305.2
  Top Layer w10: U1.1 5217.5,4541.5 5217.5,4836.75 J7.2
NetR101_2: R101.2 U3.10 | length 137.9
  Top Layer w10: R101.2 1771,4643 1806,4678 1806,4725.91 U3.10@1806.91,4726.82
NetR104_1: R104.1 U3.4 | length 174.1
  Top Layer w10: U3.4@1911.08,4704.38 1911.08,4683.86 1931.94,4663 1995.68,4663 2010.6,4648.08 R104.1@2010.6,4608.83
NetR202_2: R202.2 U4.10 | length 97.2
  Top Layer w10: R202.2 2383,3258 2409,3284 2409,3318.55 2409.91,3319.46 U4.10
NetR205_1: R205.1 U4.4 | length 150.8
  Top Layer w10: U4.4 2514,3275 2526,3263 2594,3263 2611.95,3245.05 R205.1
NetU1_3V1: U1.3V1 U2.4 | length 255.1
  Top Layer w10: U1.3V1 5214,3830 U2.4
NetU1_22: U1.22 U2.7 | length 213.7
  Top Layer w10: U1.22 5016,3936 5016,3728 U2.7
NetU1_23: U1.23 U2.6 | length 213.7
  Top Layer w10: U1.23 5116,3936 5116,3728 U2.6
VCC: C101.2 C103.1 C201.2 J1.1 L201.1 pad.2@1480,5085 U3.8
  other v1: 1566,3464 1626,3464 1686,3464 1746,3464 1806,3464 1566,3524 1626,3524 1686,3524 1746,3524 1806,3524 1581,4868 1641,4868 1701,4868 1761,4868 1821,4868 1581,4928 1641,4928 1701,4928 1761,4928 1821,4928
pads on no net: J2.2 J6.1 J6.4 R104.2 R205.2 U1.2 U1.3 U1.3V2 U1.4 U1.5 U1.6 U1.7 U1.8 U1.9 U1.10 U1.11 U1.12 U1.13 U1.14 U1.15 U1.16 U1.17 U1.18 U1.19 U1.20 U1.21 U1.24 U1.25 U1.26 U1.27 U1.28 U1.29 U1.30 U1.31 U1.32 U1.33 U1.34 U1.35 U1.36 U1.37 U1.38 U1.39 U1.40 U1.41 U2.2 U2.8 U2.9 U2.10 U2.P1 U2.P2 U3.1 U4.1

## Polygon pours and split planes (outlines as drawn)
NetC203_2 on Top Layer (solid, pour order 24): 2149,3373 2384,3373 2384,3383 2503,3383 2503,3443 2474,3443 2474,3470 2099,3470 2099,3401 2149,3401 2149,3383
VCC on Top Layer "VCC_L01_P002" (solid, pour order 2): 1899.19,4789.85 1544.86,4789.85 1544.86,4958 1899.19,4958
+5V on Top Layer "+5V_L01_P003" (solid, pour order 3): 2127.54,4774.1 2440,4774.1 2440,5013 2127.54,5013
GND on Top Layer (solid, pour order 7): 1546,4323 1791,4323 1791,4578 1746,4578 1746,4693 1801,4748 1901,4748 1901,4769 1696,4769 1696,4533 1546,4533
GND on Top Layer "GND_L01_P008" (solid, pour order 8): 2186,4500.5 2376,4500.5 2376,4250 2186,4250
NetC104_2 on Top Layer (solid, pour order 16): 1877.66,4777.18 1903.73,4777.18 1919.9,4761 2082,4761 2082,4961.16 1986,4961.16 1986,4953.88 1927,4953 1927,4916 1986,4916 1986,4789.03 1877.72,4788.9 1877.66,4788.84
NetC212_2 on Top Layer "NETC212_2_L01_P012" (solid, pour order 12): 2858,3171 3027,3171 3027,3076 2858,3076
NetC213_2 on Top Layer "NETC213_2_L01_P014" (solid, pour order 14): 2747,3190 2748,3189 2917,3189 2917,3284 2747,3284
NetC206_2 on Top Layer (solid, pour order 18): 2481,3365 2513,3365 2538,3340 2698,3340 2698,3595 2579,3595 2579,3544 2511,3544 2511,3505 2579,3505 2579,3377 2481,3377
VCC on Top Layer "VCC_L01_P026" (solid, pour order 26): 1893,3563 1893,3413 1892,3412 1746,3412 1746,3204 1666,3204 1666,3412 1527,3412 1527,3563
NetC207_1 on Top Layer "NETC207_1_L01_P027" (solid, pour order 27): 2070,3443 2027,3443 2027,3391 1983,3391 1983,3256 2062,3256 2062,3392 2070,3392
GND on Top Layer (solid, pour order 34): 2622,2905 2808,2905 2808,3173 2746,3173 2746,3107 2728.68,3107 2695,3124.4 2695,3203 2670,3203 2670,3155 2622,3107
GND on Top Layer (solid, pour order 37): 1660,2320 2148,2320 2278,2450 2278,3068 2395,3185 2395,3224 2373,3224 2361,3212 2361,3297.37 2396,3339 2503,3339 2503,3356 2302,3356 2302,3153 2283,3134 2152,3134 2152,2483 2075,2483 2059,2499 2059,2596 1983,2596 1983,2442 1776,2442 1747,2471 1747,2605 1663,2605
+12V on Top Layer "+12V_L01_P038" (solid, pour order 38): 2873,3596 2873,3374 2919,3374 2965,3328 2965,3186 3029,3186 3029,3269 3175,3415 3175,3597.3
+12V on Power "+12V_L03_P042" (solid, pour order 42): 2087,3619 2087,2120 5595,2120 5595,3619
VCC on Power "VCC_L03_P040" (solid, pour order 40): 1330.85,5235 2065,5235 2065,2120 1329.97,2120
+5V on Power "+5V_L03_P041" (solid, pour order 41): 2087,5235 5595,5235 5595,3642 2087,3642
GND on Ground "GND_L02_P000" (solid, pour order 0): 1330,5235 5595,5235 5595,2120 1330,2120

## Silkscreen, mask and mechanical layers (free items; w line width, h text height)
Mechanical 1:
  the board outline again, w10